# Altium PCB imprimir.PcbDoc (part 1 of 4)
Units mm, origin at the board's own origin, x right, y up, seen from the top; angles counter-clockwise.
Board outline 196.72 x 221.49 mm, 2 copper layers (Top Layer, Bottom Layer); 172 components, 0 nets, 904 pads, 232 vias.
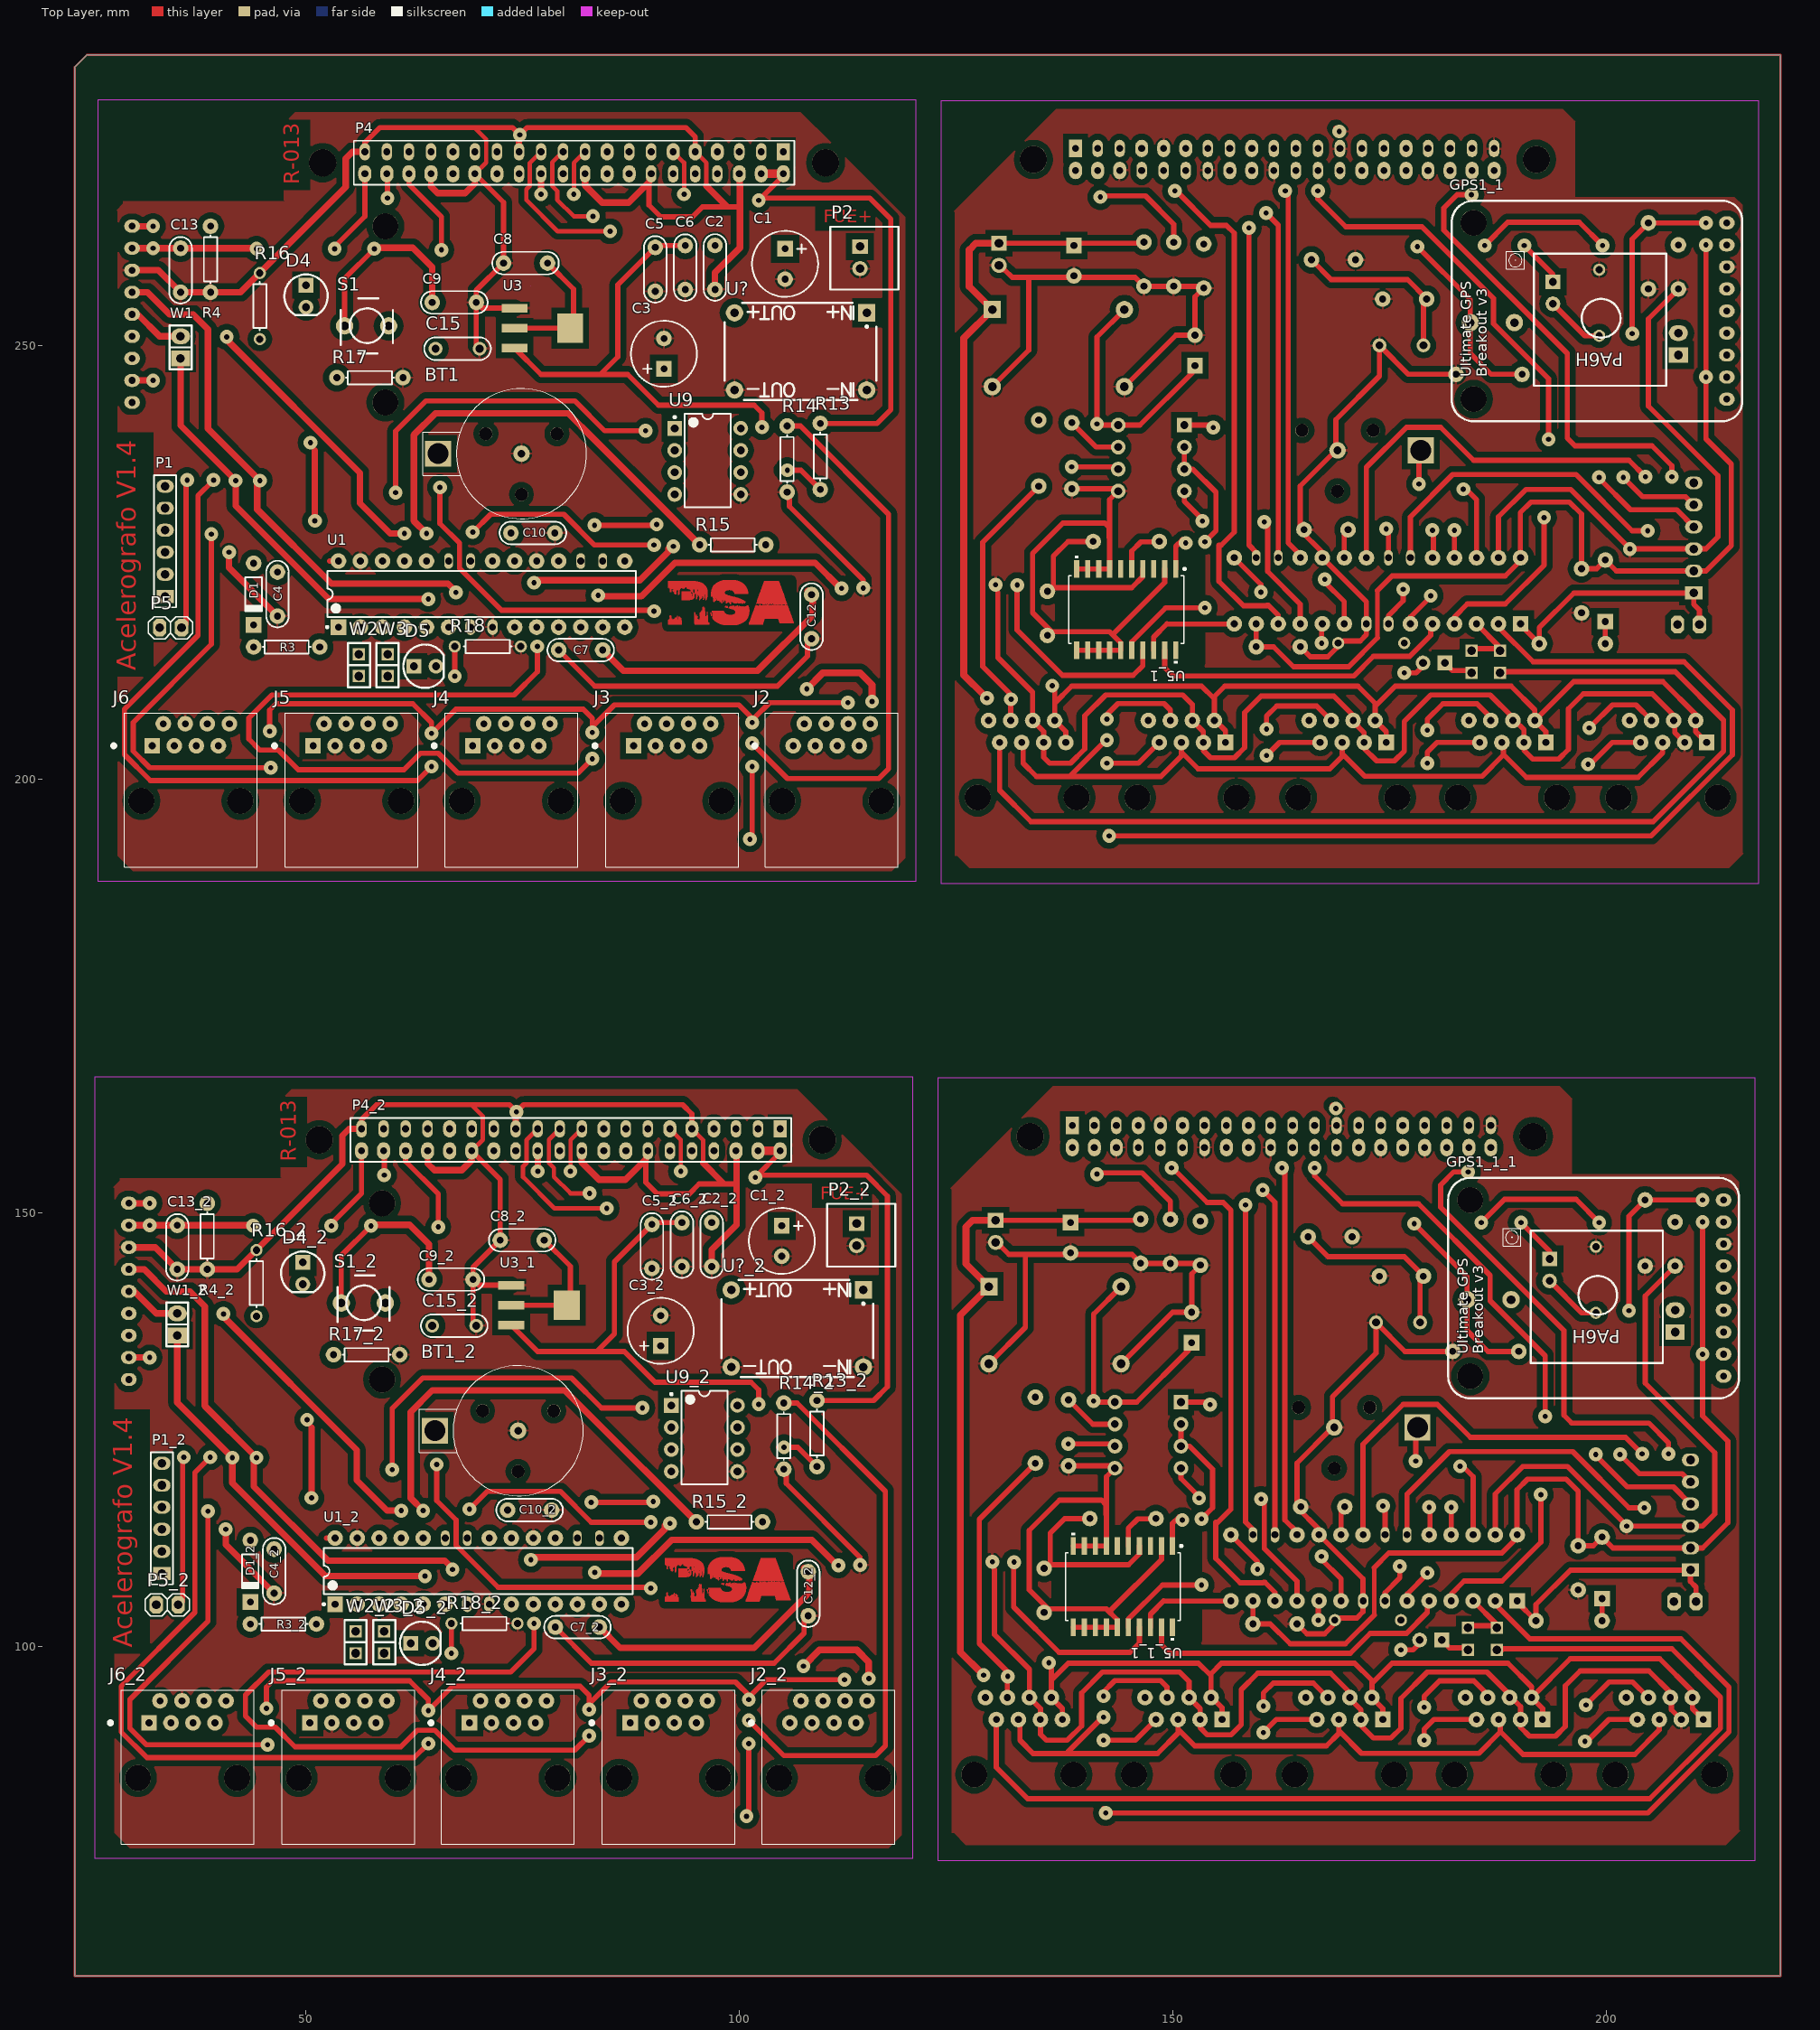
[diagram p0: Top Layer view]
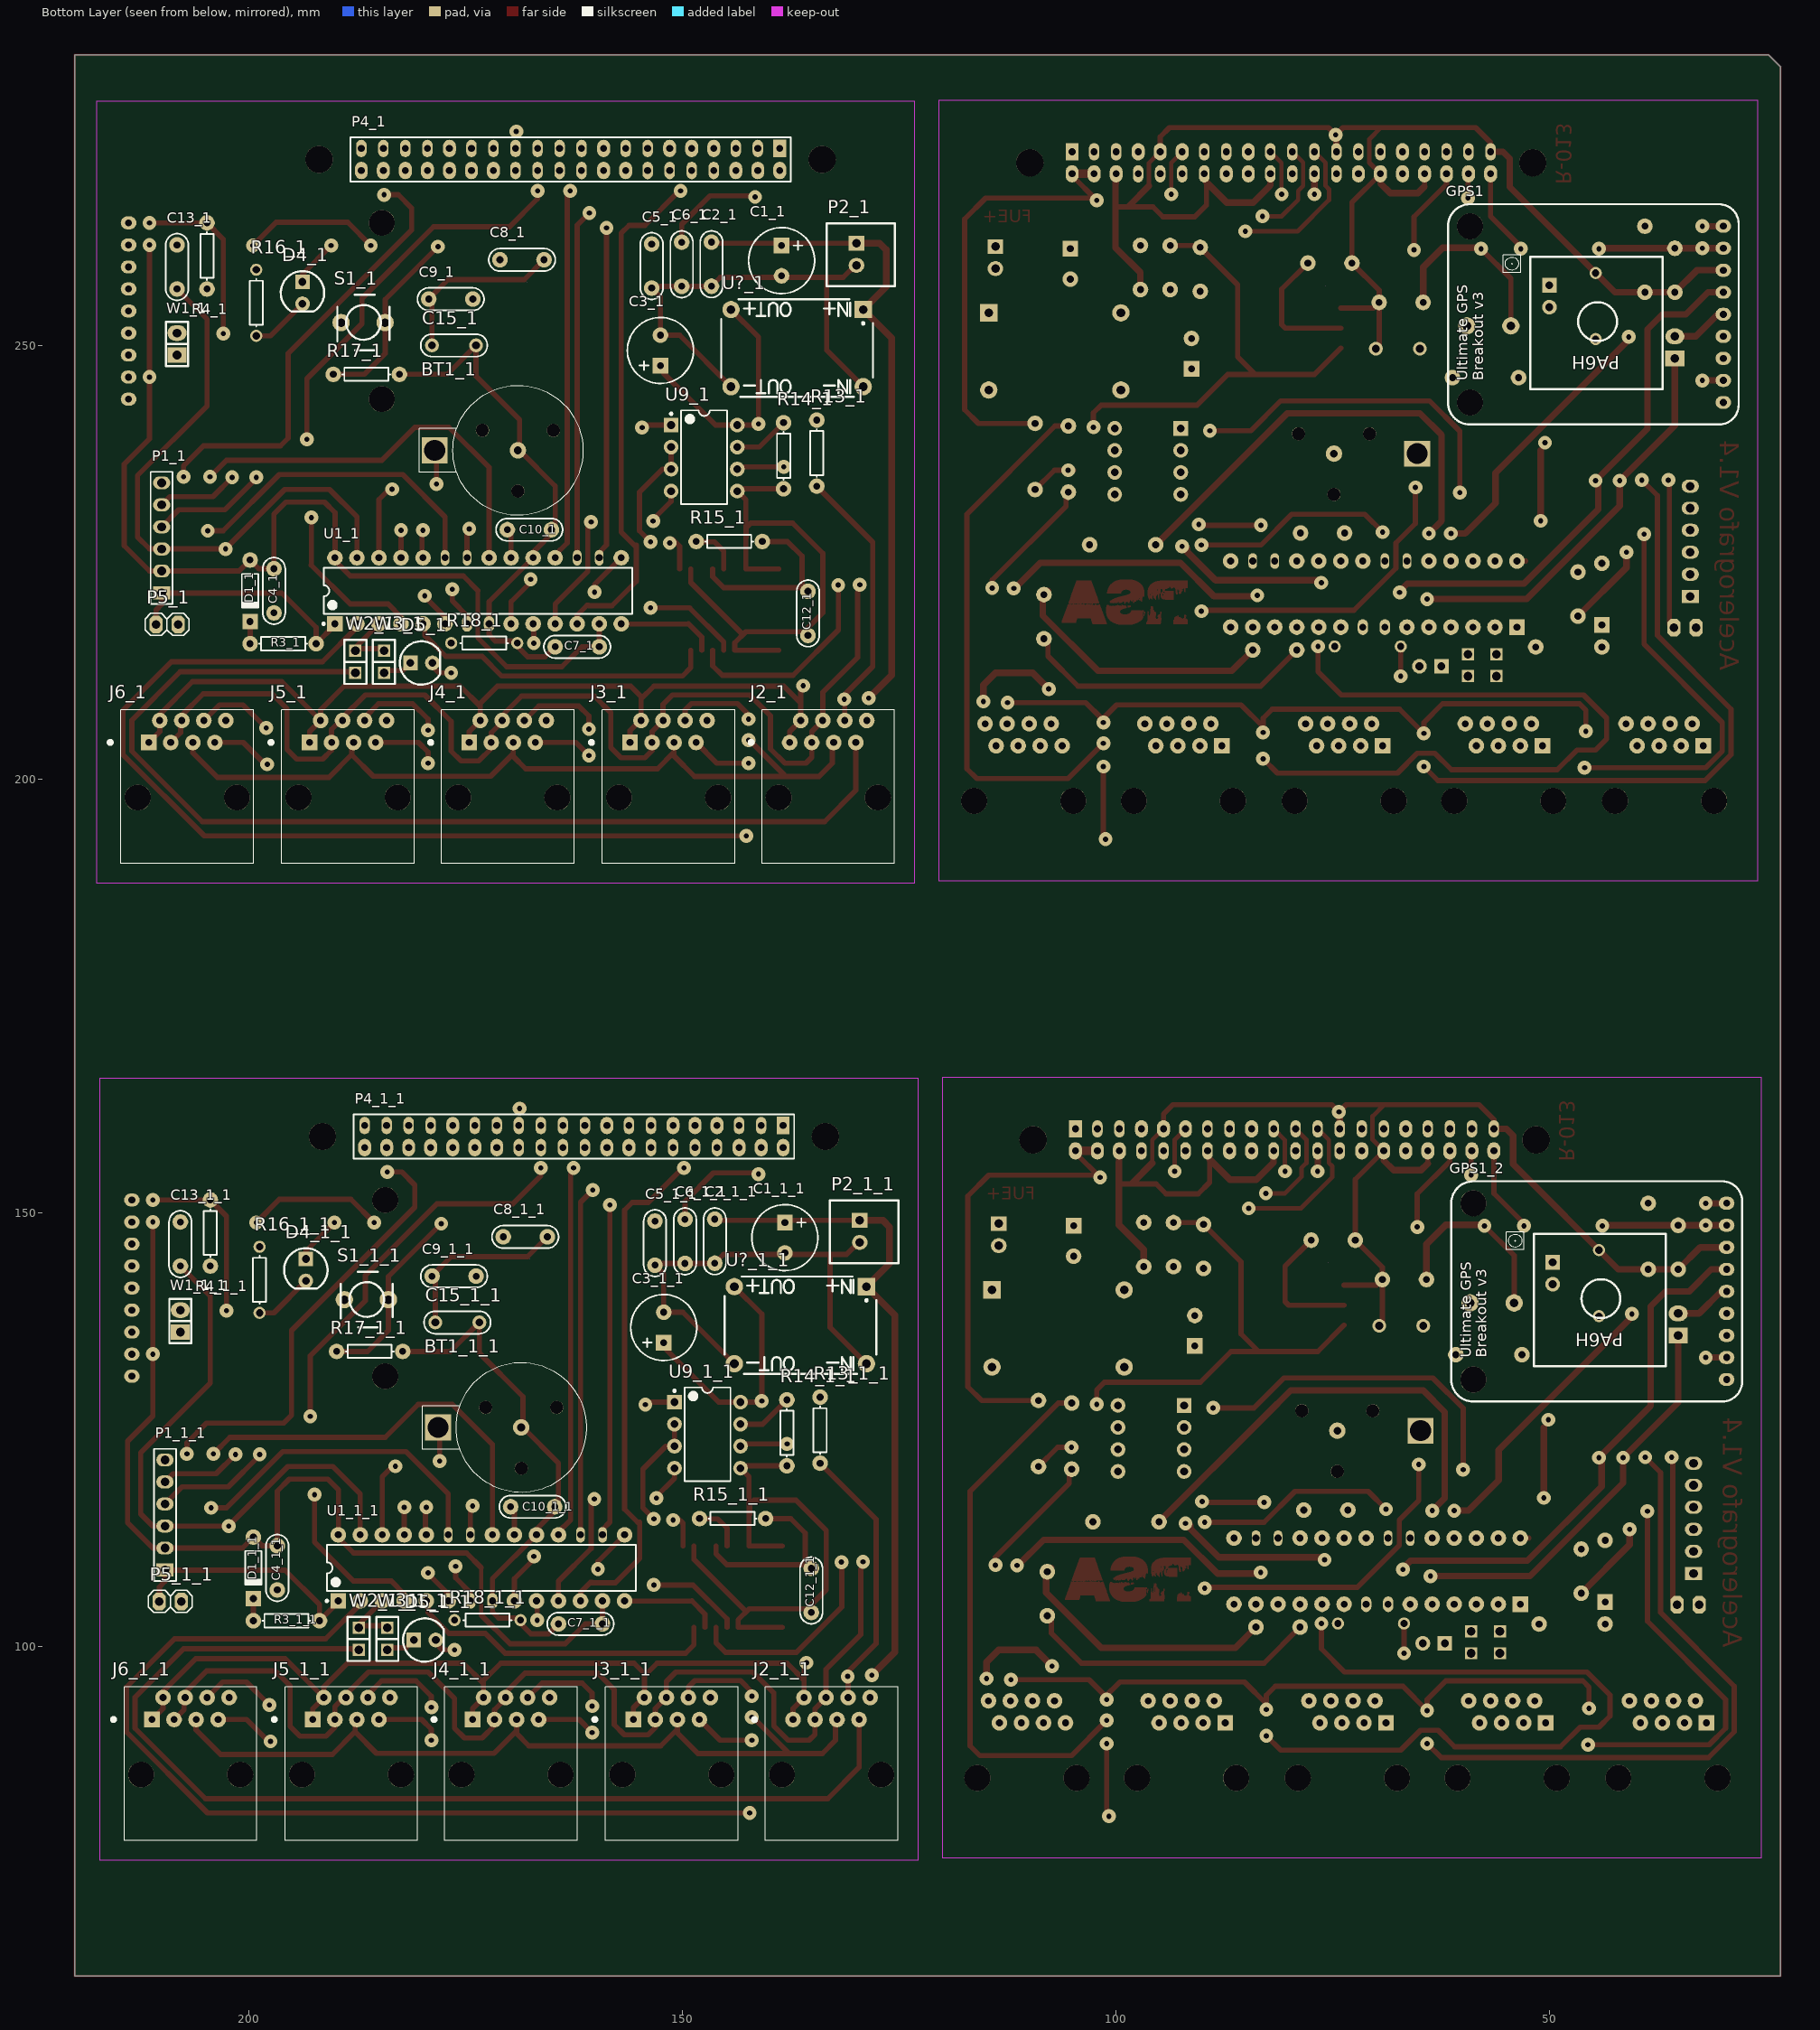
[diagram p1: Bottom Layer view, seen from below]

## Layer stack, top to bottom
Top Solder: solder mask 0.0102, Solder Resist, Dk 3.5
Top Layer: signal copper 0.0356
Dielectric 1: dielectric 0.32, FR-4, Dk 4.8
Bottom Layer: signal copper 0.0356
Bottom Solder: solder mask 0.0102, Solder Resist, Dk 3.5

## Board outline
23.368,61.976 23.368,282.067 24.765,283.464 220.091,283.464 220.091,61.976
cut-out: 75.51,144.231
cut-out: 167.594,144.612
cut-out: 167.975,257.261
cut-out: 75.891,256.88

## Design rules (kind name [scope] priority, off if disabled: settings)
Clearance [All] p1: gap=0.254
PolygonConnect [All] p1: connectstyle=Relief reliefconductorwidth=0.254 reliefentries=4 polygonreliefangle="90 Angle" airgapwidth=0.254
RoutingVias [All] p1: holewidth=0.711 width=1.27 viastyle="Through Hole" minholewidth=0.711 minwidth=1.27 maxholewidth=0.711 maxwidth=1.27
SolderMaskExpansion [All] p1: expansion=0.102
Width [All] p1: maxlimit=0.254 minlimit=0.254 preferedwidth=0.254
30 further rules are at their usual default settings.

## Components (designator, comment, footprint, x,y, rotation, side; value= is the part's Value field where it differs from the comment)
BT1 "Bateria" Bateria-DS1307 65.278,237.49 r0 top
BT1_1 "Bateria" Bateria-DS1307 178.587,237.871 r180 bottom (schematic designator BT1)
BT1_1_1 "Bateria" Bateria-DS1307 178.206,125.222 r180 bottom (schematic designator BT1)
BT1_2 "Bateria" Bateria-DS1307 64.897,124.841 r0 top (schematic designator BT1)
C1 "Cap" C100UFB 105.283,261.112 r270 top
C1_1 "Cap" C100UFB 138.582,261.493 r270 bottom (schematic designator C1)
C1_1_1 "Cap" C100UFB 138.201,148.844 r270 bottom (schematic designator C1)
C1_2 "Cap" C100UFB 104.902,148.463 r270 top (schematic designator C1)
C2 "Cap" RAD0.2#1 97.198,261.497 r270 top
C2_1 "Cap" RAD0.2#1 146.667,261.878 r270 bottom (schematic designator C2)
C2_1_1 "Cap" RAD0.2#1 146.286,149.229 r270 bottom (schematic designator C2)
C2_2 "Cap" RAD0.2#1 96.817,148.848 r270 top (schematic designator C2)
C3 "Cap" C100UFB 91.313,247.269 r90 top
C3_1 "Cap" C100UFB 152.552,247.65 r90 bottom (schematic designator C3)
C3_1_1 "Cap" C100UFB 152.171,135.001 r90 bottom (schematic designator C3)
C3_2 "Cap" C100UFB 90.932,134.62 r90 top (schematic designator C3)
C4 "Cap" RAD0.2#1 46.747,223.838 r270 top
C4_1 "Cap" RAD0.2#1 197.119,224.219 r270 bottom (schematic designator C4)
C4_1_1 "Cap" RAD0.2#1 196.738,111.57 r270 bottom (schematic designator C4)
C4_2 "Cap" RAD0.2#1 46.366,111.189 r270 top (schematic designator C4)
C5 "Cap" RAD0.2#1 90.304,261.278 r270 top
C5_1 "Cap" RAD0.2#1 153.561,261.659 r270 bottom (schematic designator C5)
C5_1_1 "Cap" RAD0.2#1 153.18,149.01 r270 bottom (schematic designator C5)
C5_2 "Cap" RAD0.2#1 89.923,148.629 r270 top (schematic designator C5)
C6 "Cap" RAD0.2#1 93.766,261.485 r270 top
C6_1 "Cap" RAD0.2#1 150.1,261.866 r270 bottom (schematic designator C6)
C6_1_1 "Cap" RAD0.2#1 149.719,149.217 r270 bottom (schematic designator C6)
C6_2 "Cap" RAD0.2#1 93.385,148.836 r270 top (schematic designator C6)
C7 "Cap" RAD0.2#1 84.253,214.846 r180 top
C7_1 "Cap" RAD0.2#1 159.613,215.227 r0 bottom (schematic designator C7)
C7_1_1 "Cap" RAD0.2#1 159.232,102.578 r0 bottom (schematic designator C7)
C7_2 "Cap" RAD0.2#1 83.872,102.197 r180 top (schematic designator C7)
C8 "Cap" RAD0.2#1 77.89,259.46 r180 top
C8_1 "Cap" RAD0.2#1 165.976,259.841 r0 bottom (schematic designator C8)
C8_1_1 "Cap" RAD0.2#1 165.595,147.192 r0 bottom (schematic designator C8)
C8_2 "Cap" RAD0.2#1 77.509,146.811 r180 top (schematic designator C8)
C9 "Cap" RAD0.2#1 64.595,254.927 r0 top
C9_1 "Cap" RAD0.2#1 179.271,255.308 r180 bottom (schematic designator C9)
C9_1_1 "Cap" RAD0.2#1 178.89,142.659 r180 bottom (schematic designator C9)
C9_2 "Cap" RAD0.2#1 64.214,142.278 r0 top (schematic designator C9)
C10 "Cap" RAD0.2#1 73.66,228.346 r0 top
C10_1 "Cap" RAD0.2#1 170.205,228.727 r180 bottom (schematic designator C10)
C10_1_1 "Cap" RAD0.2#1 169.824,116.078 r180 bottom (schematic designator C10)
C10_2 "Cap" RAD0.2#1 73.279,115.697 r0 top (schematic designator C10)
C12 "Cap" RAD0.2#1 108.331,221.234 r270 top
C12_1 "Cap" RAD0.2#1 135.534,221.615 r270 bottom (schematic designator C12)
C12_1_1 "Cap" RAD0.2#1 135.153,108.966 r270 bottom (schematic designator C12)
C12_2 "Cap" RAD0.2#1 107.95,108.585 r270 top (schematic designator C12)
C13 "Cap" RAD0.2#1 35.571,261.176 r270 top
C13_1 "Cap" RAD0.2#1 208.295,261.557 r270 bottom (schematic designator C13)
C13_1_1 "Cap" RAD0.2#1 207.914,148.908 r270 bottom (schematic designator C13)
C13_2 "Cap" RAD0.2#1 35.19,148.527 r270 top (schematic designator C13)
C15 "Cap" RAD0.2#2 64.969,249.593 r0 top
C15_1 "Cap" RAD0.2#2 178.896,249.974 r180 bottom (schematic designator C15)
C15_1_1 "Cap" RAD0.2#2 178.515,137.325 r180 bottom (schematic designator C15)
C15_2 "Cap" RAD0.2#2 64.588,136.944 r0 top (schematic designator C15)
D1 "1N914" DO-35 43.994,221.298 r270 top
D1_1 "1N914" DO-35 199.872,221.679 r270 bottom (schematic designator D1)
D1_1_1 "1N914" DO-35 199.491,109.03 r270 bottom (schematic designator D1)
D1_2 "1N914" DO-35 43.613,108.649 r270 top (schematic designator D1)
D4 "LED3" LED2 50.038,255.651 r270 top
D4_1 "LED3" LED2 193.827,256.032 r270 bottom (schematic designator D4)
D4_1_1 "LED3" LED2 193.446,143.383 r270 bottom (schematic designator D4)
D4_2 "LED3" LED2 49.657,143.002 r270 top (schematic designator D4)
D5 "LED3" LED2 63.754,212.979 r0 top (schematic designator D4)
D5_1 "LED3" LED2 180.111,213.36 r180 bottom (schematic designator D4)
D5_1_1 "LED3" LED2 179.73,100.711 r180 bottom (schematic designator D4)
D5_2 "LED3" LED2 63.373,100.33 r0 top (schematic designator D4)
GPS1 "GPS_BREAKOUT_V3" GPS_BREAKOUT_V3 29.983,263.716 r0 bottom
GPS1_1 "GPS_BREAKOUT_V3" GPS_BREAKOUT_V3 213.883,264.097 r180 top (schematic designator GPS1)
GPS1_1_1 "GPS_BREAKOUT_V3" GPS_BREAKOUT_V3 213.502,151.448 r180 top (schematic designator GPS1)
GPS1_2 "GPS_BREAKOUT_V3" GPS_BREAKOUT_V3 29.602,151.067 r0 bottom (schematic designator GPS1)
J2 "54602-908LF" *AMPHENOL_54602-908LF#1 110.665,197.461 r0 top
J2_1 "54602-908LF" *AMPHENOL_54602-908LF#1 133.2,197.842 r180 bottom (schematic designator J2)
J2_1_1 "54602-908LF" *AMPHENOL_54602-908LF#1 132.819,85.193 r180 bottom (schematic designator J2)
J2_2 "54602-908LF" *AMPHENOL_54602-908LF#1 110.284,84.812 r0 top (schematic designator J2)
J3 "54602-908LF" *AMPHENOL_54602-908LF#2 92.25,197.461 r0 top
J3_1 "54602-908LF" *AMPHENOL_54602-908LF#2 151.615,197.842 r180 bottom (schematic designator J3)
J3_1_1 "54602-908LF" *AMPHENOL_54602-908LF#2 151.234,85.193 r180 bottom (schematic designator J3)
J3_2 "54602-908LF" *AMPHENOL_54602-908LF#2 91.869,84.812 r0 top (schematic designator J3)
J4 "54602-908LF" *AMPHENOL_54602-908LF#2 73.708,197.461 r0 top
J4_1 "54602-908LF" *AMPHENOL_54602-908LF#2 170.157,197.842 r180 bottom (schematic designator J4)
J4_1_1 "54602-908LF" *AMPHENOL_54602-908LF#2 169.776,85.193 r180 bottom (schematic designator J4)
J4_2 "54602-908LF" *AMPHENOL_54602-908LF#2 73.327,84.812 r0 top (schematic designator J4)
J5 "54602-908LF" *AMPHENOL_54602-908LF#2 55.293,197.461 r0 top
J5_1 "54602-908LF" *AMPHENOL_54602-908LF#2 188.572,197.842 r180 bottom (schematic designator J5)
J5_1_1 "54602-908LF" *AMPHENOL_54602-908LF#2 188.191,85.193 r180 bottom (schematic designator J5)
J5_2 "54602-908LF" *AMPHENOL_54602-908LF#2 54.912,84.812 r0 top (schematic designator J5)
J6 "54602-908LF" *AMPHENOL_54602-908LF#2 36.751,197.461 r0 top
J6_1 "54602-908LF" *AMPHENOL_54602-908LF#2 207.114,197.842 r180 bottom (schematic designator J6)
J6_1_1 "54602-908LF" *AMPHENOL_54602-908LF#2 206.733,85.193 r180 bottom (schematic designator J6)
J6_2 "54602-908LF" *AMPHENOL_54602-908LF#2 36.37,84.812 r0 top (schematic designator J6)
P1 "Grabador" HDR1X6 33.793,221.044 r90 top
P1_1 "Grabador" HDR1X6 210.073,221.425 r90 bottom (schematic designator P1)
P1_1_1 "Grabador" HDR1X6 209.692,108.776 r90 bottom (schematic designator P1)
P1_2 "Grabador" HDR1X6 33.412,108.395 r90 top (schematic designator P1)
P2 "Entrada fuente externa" MOLEX-2 113.919,261.366 r270 top
P2_1 "Entrada fuente externa" MOLEX-2 129.946,261.747 r270 bottom (schematic designator P2)
P2_1_1 "Entrada fuente externa" MOLEX-2 129.565,149.098 r270 bottom (schematic designator P2)
P2_2 "Entrada fuente externa" MOLEX-2 113.538,148.717 r270 top (schematic designator P2)
P4 "RPI_Pins" HDR2X20 105.081,272.298 r180 top
P4_1 "RPI_Pins" HDR2X20 138.785,272.679 r0 bottom (schematic designator P4)
P4_1_1 "RPI_Pins" HDR2X20 138.404,160.03 r0 bottom (schematic designator P4)
P4_2 "RPI_Pins" HDR2X20 104.7,159.649 r180 top (schematic designator P4)
P5 "Header 2" "Header 1X2" 33.147,217.424 r0 top
P5_1 "Header 2" "Header 1X2" 210.718,217.805 r180 bottom (schematic designator P5)
P5_1_1 "Header 2" "Header 1X2" 210.337,105.156 r180 bottom (schematic designator P5)
P5_2 "Header 2" "Header 1X2" 32.766,104.775 r0 top (schematic designator P5)
R3 "Res1" AXIAL-0.3#1 47.804,215.202 r180 top
R3_1 "Res1" AXIAL-0.3#1 196.062,215.583 r0 bottom (schematic designator R3)
R3_1_1 "Res1" AXIAL-0.3#1 195.681,102.934 r0 bottom (schematic designator R3)
R3_2 "Res1" AXIAL-0.3#1 47.423,102.553 r180 top (schematic designator R3)
R4 "Res1" AXIAL-0.3#1 39.025,259.906 r270 top
R4_1 "Res1" AXIAL-0.3#1 204.84,260.287 r270 bottom (schematic designator R4)
R4_1_1 "Res1" AXIAL-0.3#1 204.459,147.638 r270 bottom (schematic designator R4)
R4_2 "Res1" AXIAL-0.3#1 38.644,147.257 r270 top (schematic designator R4)
R13 "Res1" AXIAL-0.3#1 109.34,237.169 r90 top
R13_1 "Res1" AXIAL-0.3#1 134.525,237.55 r90 bottom (schematic designator R13)
R13_1_1 "Res1" AXIAL-0.3#1 134.144,124.901 r90 bottom (schematic designator R13)
R13_2 "Res1" AXIAL-0.3#1 108.959,124.52 r90 top (schematic designator R13)
R14 "Res1" AXIAL-0.3#1 105.515,236.867 r270 top
R14_1 "Res1" AXIAL-0.3#1 138.35,237.248 r270 bottom (schematic designator R14)
R14_1_1 "Res1" AXIAL-0.3#1 137.969,124.599 r270 bottom (schematic designator R14)
R14_2 "Res1" AXIAL-0.3#1 105.134,124.218 r270 top (schematic designator R14)
R15 "Res1" AXIAL-0.3#1 99.249,226.983 r0 top
R15_1 "Res1" AXIAL-0.3#1 144.617,227.364 r180 bottom (schematic designator R15)
R15_1_1 "Res1" AXIAL-0.3#1 144.236,114.715 r180 bottom (schematic designator R15)
R15_2 "Res1" AXIAL-0.3#1 98.868,114.334 r0 top (schematic designator R15)
R16 "Res1" AXIAL-0.3#2 44.704,254.508 r90 top
R16_1 "Res1" AXIAL-0.3#2 199.161,254.889 r90 bottom (schematic designator R16)
R16_1_1 "Res1" AXIAL-0.3#2 198.78,142.24 r90 bottom (schematic designator R16)
R16_2 "Res1" AXIAL-0.3#2 44.323,141.859 r90 top (schematic designator R16)
R17 "Res1" AXIAL-0.3#1 57.404,246.253 r0 top
R17_1 "Res1" AXIAL-0.3#1 186.461,246.634 r180 bottom (schematic designator R17)
R17_1_1 "Res1" AXIAL-0.3#1 186.08,133.985 r180 bottom (schematic designator R17)
R17_2 "Res1" AXIAL-0.3#1 57.023,133.604 r0 top (schematic designator R17)
R18 "Res1" AXIAL-0.3#3 70.993,215.265 r0 top (schematic designator R17)
R18_1 "Res1" AXIAL-0.3#3 172.872,215.646 r180 bottom (schematic designator R17)
R18_1_1 "Res1" AXIAL-0.3#3 172.491,102.997 r180 bottom (schematic designator R17)
R18_2 "Res1" AXIAL-0.3#3 70.612,102.616 r0 top (schematic designator R17)
S1 "SW-PB" PULSA4 57.023,252.222 r0 top
S1_1 "SW-PB" PULSA4 186.842,252.603 r180 bottom (schematic designator S1)
S1_1_1 "SW-PB" PULSA4 186.461,139.954 r180 bottom (schematic designator S1)
S1_2 "SW-PB" PULSA4 56.642,139.573 r0 top (schematic designator S1)
U1 "DSPIC33EP256MC202-I/SP" MCHP-SPDIP-SP28 70.283,221.298 r90 top
U1_1 "DSPIC33EP256MC202-I/SP" MCHP-SPDIP-SP28 173.583,221.679 r90 bottom (schematic designator U1)
U1_1_1 "DSPIC33EP256MC202-I/SP" MCHP-SPDIP-SP28 173.202,109.03 r90 bottom (schematic designator U1)
U1_2 "DSPIC33EP256MC202-I/SP" MCHP-SPDIP-SP28 69.902,108.649 r90 top (schematic designator U1)
U3 "LD33V" SOT-223 74.093,254.267 r270 top
U3_1 "LD33V" SOT-223 73.712,141.618 r270 top (schematic designator U3)
U5_1 "DS3234S#" 21-0042B_20 144.617,219.507 r270 top (schematic designator U5)
U5_1_1 "DS3234S#" 21-0042B_20 144.236,106.858 r270 top (schematic designator U5)
U9 "MAX485" MAX485 92.546,240.409 r270 top
U9_1 "MAX485" MAX485 151.319,240.79 r270 bottom (schematic designator U9)
U9_1_1 "MAX485" MAX485 150.938,128.141 r270 bottom (schematic designator U9)
U9_2 "MAX485" MAX485 92.165,127.76 r270 top (schematic designator U9)
U? "STEP_DOWN_CONVERTER" STEP_DOWN_CONVERTER 115.824,254.889 r180 top
U?_1 "STEP_DOWN_CONVERTER" STEP_DOWN_CONVERTER 128.041,255.27 r0 bottom (schematic designator U?)
U?_1_1 "STEP_DOWN_CONVERTER" STEP_DOWN_CONVERTER 127.66,142.621 r0 bottom (schematic designator U?)
U?_2 "STEP_DOWN_CONVERTER" STEP_DOWN_CONVERTER 115.443,142.24 r180 top (schematic designator U?)
W1 "Jumper" SIP-2#1 35.571,248.476 r90 top
W1_1 "Jumper" SIP-2#1 208.295,248.857 r90 bottom (schematic designator W1)
W1_1_1 "Jumper" SIP-2#1 207.914,136.208 r90 bottom (schematic designator W1)
W1_2 "Jumper" SIP-2#1 35.19,135.827 r90 top (schematic designator W1)
W2 "Jumper" SIP-2#2 56.134,214.376 r270 top
W2_1 "Jumper" SIP-2#2 187.731,214.757 r270 bottom (schematic designator W2)
W2_1_1 "Jumper" SIP-2#2 187.35,102.108 r270 bottom (schematic designator W2)
W2_2 "Jumper" SIP-2#2 55.753,101.727 r270 top (schematic designator W2)
W3 "Jumper" SIP-2#2 59.436,214.376 r270 top
W3_1 "Jumper" SIP-2#2 184.429,214.757 r270 bottom (schematic designator W3)
W3_1_1 "Jumper" SIP-2#2 184.048,102.108 r270 bottom (schematic designator W3)
W3_2 "Jumper" SIP-2#2 59.055,101.727 r270 top (schematic designator W3)

## Footprints (in the part's own frame and the unit in brackets; to place one, negate y for a bottom-side part, rotate by r counter-clockwise, add the part's x,y. Pads: shape width x height; smd on the part's side, far side on the other; paste and mask are expansions set on the pad)
21-0042B_20 [mm]
  rect 2x0.6 smd paste+0 mask+0: 1(-4.686,5.715) 2(-4.686,4.445) 3(-4.686,3.175) 4(-4.686,1.905) 5(-4.686,0.635) 6(-4.686,-0.635) 7(-4.686,-1.905) 8(-4.686,-3.175) 9(-4.686,-4.445) 10(-4.686,-5.715) 11(4.686,-5.715) 12(4.686,-4.445) 13(4.686,-3.175) 14(4.686,-1.905) 15(4.686,-0.635) 16(4.686,0.635) 17(4.686,1.905) 18(4.686,3.175) 19(4.686,4.445) 20(4.686,5.715)
  silkscreen extent -6.18,-6.63 6.18,6.86, body extent -5.32,-6.5 5.32,6.5, height 2.64
*AMPHENOL_54602-908LF#1 [mm]
  round 1.8 hole 0.8: 1(-4.445,6.35) 2(-3.175,8.89) 3(-1.905,6.35) 4(-0.635,8.89) 5(0.635,6.35) 6(1.905,8.89) 7(3.175,6.35) 8(4.445,8.89)
  round 3 hole 3 unplated: None(-5.715,0) None(5.715,0)
  silkscreen extent -9.09,-7.62 7.65,10.12
*AMPHENOL_54602-908LF#2 [mm]
  rect 1.8x1.8 hole 0.8: 1(-4.445,6.35)
  round 1.8 hole 0.8: 2(-3.175,8.89) 3(-1.905,6.35) 4(-0.635,8.89) 5(0.635,6.35) 6(1.905,8.89) 7(3.175,6.35) 8(4.445,8.89)
  round 3 hole 3 unplated: None(-5.715,0) None(5.715,0)
  silkscreen extent -9.09,-7.62 7.65,10.12
AXIAL-0.3#1 [mm] "Axial Device, Thru-Hole; 2 Leads; 0.3 in Pin Spacing"
  round 1.8 hole 0.8: 1(-3.81,0) 2(3.81,0)
  silkscreen extent -2.77,-0.76 2.77,0.76
AXIAL-0.3#2 [mm] "Axial Device, Thru-Hole; 2 Leads; 0.3 in Pin Spacing"
  round 1.4 hole 0.85: 1(-3.81,0) 2(3.81,0)
  silkscreen extent -2.77,-0.76 2.77,0.76
AXIAL-0.3#3 [mm] "Axial Device, Thru-Hole; 2 Leads; 0.3 in Pin Spacing"
  round 1.4 hole 0.8: 1(-3.81,0) 2(3.81,0)
  silkscreen extent -2.77,-0.76 2.77,0.76
Bateria-DS1307 [mm]
  rect 3x3 hole 2.4: 0(0,0)
  round 1.9 hole 0.9: 1(9.6,0)
  round 1.524 hole 1.5: 2(5.5,2.3) 3(13.7,2.3) 4(9.6,-4.7)
  silkscreen extent -1.78,-7.5 17.1,7.5, body extent -1.8,-7.43 17.24,7.63, height 4.31
C100UFB [mm]
  rect 1.8x1.8 hole 0.8: 1(0,0)
  round 1.8 hole 0.8: 2(3.5,0)
  silkscreen extent -2.07,-3.81 5.55,3.81
DO-35 [mm] "Diode, Axial; Body 3.8 x 1.9 mm (LxDia. max), Lead Dia. 0.53 mm (max)"
  round 1.8 hole 0.8: 1(-3.55,0)
  rect 1.8x1.8 hole 0.8: 2(3.55,0)
  silkscreen extent -1.95,-0.95 2.05,0.95
GPS_BREAKOUT_V3 [mm]
  oval 1.8x1.5 hole 0.8: 0(0,0) 1(0,2.54) 2(0,5.08) 3(0,7.62) 4(0,10.16) 5(0,12.7) 6(0,15.24) 7(0,17.78) 8(0,20.32)
  round 3 hole 3: ""(29.21,0) ""(29.21,20.32)
  silkscreen extent -1.78,-2.54 31.75,22.86
HDR1X6 [mm] "Connector; Header; 6 Position"
  rect 1.5x2 hole 1: 1(0,0)
  oval 1.5x2 hole 1: 2(2.54,0) 3(5.08,0) 4(7.62,0) 5(10.16,0) 6(12.7,0)
  silkscreen extent -1.27,-1.27 13.97,1.27
HDR2X20 [mm] "Connector; Header; 20x2 Position"
  rect 1.5x2 hole 0.8: 1(0,0)
  oval 1.5x2 hole 0.8: 2(0,2.54) 4(2.54,2.54) 6(5.08,2.54) 7(7.62,0) 9(10.16,0) 11(12.7,0) 16(17.78,2.54) 17(20.32,0) 18(20.32,2.54) 28(33.02,2.54) 30(35.56,2.54) 31(38.1,0) 32(38.1,2.54) 34(40.64,2.54) 36(43.18,2.54) 38(45.72,2.54) 40(48.26,2.54)
  oval 1.2x2 hole 0.8: 3(2.54,0) 5(5.08,0) 8(7.62,2.54) 10(10.16,2.54) 12(12.7,2.54) 13(15.24,0) 14(15.24,2.54) 15(17.78,0) 19(22.86,0) 20(22.86,2.54) 21(25.4,0) 22(25.4,2.54) 23(27.94,0) 24(27.94,2.54) 25(30.48,0) 26(30.48,2.54) 27(33.02,0) 29(35.56,0) 33(40.64,0) 35(43.18,0) 37(45.72,0) 39(48.26,0)
  silkscreen extent -1.27,-1.27 49.53,3.81
"Header 1X2" [mil] "Conector Header 1 linea 2 terminales"
  oct 60x80 hole 39.37: 1(0,0) 2(100,0)
  silkscreen extent -50,-50 150,50, body extent -50,-49 150,49, height 341
LED2 [mm]
  rect 1.7x1.7 hole 0.9: 1(-1.27,0)
  round 1.7 hole 0.9: 2(1.27,0)
  silkscreen extent -2.5,-2.5 2.17,2.5
MAX485 [mm]
  rect 1.7x1.7 hole 0.9: 1(0,0)
  round 1.7 hole 0.9: 2(2.54,0) 3(5.08,0) 4(7.62,0) 5(7.62,7.62) 6(5.08,7.62) 7(2.54,7.62) 8(0,7.62)
  silkscreen extent -1.69,-0.12 9.1,6.46, body extent -1.64,0.2 9,7.41, height 5.34
MCHP-SPDIP-SP28 [mm] "DIP, 28-Leads, Body 34.86x6.79mm, Pitch 2.54mm"
  rect 1.8x1.8 hole 0.8: 1(-3.81,16.51)
  round 1.8 hole 0.8: 2(-3.81,13.97) 3(-3.81,11.43) 4(-3.81,8.89) 5(-3.81,6.35) 6(-3.81,3.81) 9(-3.81,-3.81) 10(-3.81,-6.35) 11(-3.81,-8.89) 12(-3.81,-11.43) 13(-3.81,-13.97) 14(-3.81,-16.51) 15(3.81,-16.51) 18(3.81,-8.89) 19(3.81,-6.35) 20(3.81,-3.81) 21(3.81,-1.27) 24(3.81,6.35) 25(3.81,8.89) 26(3.81,11.43) 27(3.81,13.97) 28(3.81,16.51)
  oval 1.8x1.2 hole 0.8: 7(-3.81,1.27) 8(-3.81,-1.27)
  oval 1.8x1 hole 0.8: 16(3.81,-13.97) 17(3.81,-11.43) 22(3.81,1.27) 23(3.81,3.81)
  silkscreen extent -3.93,-17.8 2.65,17.93, body extent -3.95,-17.77 3.95,17.77, height 5.08
MOLEX-2 [mm]
  rect 1.7x1.8 hole 1: 1(0,0)
  oval 1.7x1.8 hole 1: 2(2.54,0)
  silkscreen extent -2.29,-3.43 4.95,4.45, body extent -2.31,-3.5 4.9,4.4, height 10.4
PULSA4 [mm]
  round 2 hole 1: 1(-2.54,0) 2(2.54,0)
  silkscreen extent -2.97,-3.18 3.03,3.19
RAD0.2#1 [mm]
  round 1.8 hole 0.8: 1(0,0) 2(5.08,0)
  silkscreen extent -1.3,-1.3 6.38,1.3
RAD0.2#2 [mm]
  round 1.6 hole 0.9: 1(0,0) 2(5.08,0)
  silkscreen extent -1.3,-1.3 6.38,1.3
SIP-2#1 [mm]
  rect 1.8x2.2 hole 1: 1(0,0)
  oval 1.8x2.2 hole 1: 2(2.54,0)
  silkscreen extent -1.27,-1.27 3.81,1.27
SIP-2#2 [mm]
  rect 1.4x1.4 hole 1: 1(0,0) 2(2.54,0)
  silkscreen extent -1.27,-1.27 3.81,1.27
SOT-223 [mm]
  rect 1x3 smd: 1(4.6,0) 2(0,0) 3(2.3,0)
  rect 3.4x3 smd: 3(2.3,6.4)
  body extent -1.2,1.41 5.8,5, height 1.1
STEP_DOWN_CONVERTER [mm]
  rect 2x2 hole 1: 1(1.13,1.165)
  round 2 hole 1: 2(1.13,10.055) 3(16.37,1.165) 4(16.37,10.055)
  silkscreen extent 0,0 17.5,11.22, body extent -0.14,-0.1 17.64,11.33, height 6.63

## Part data
BT1 BT1_1 BT1_1_1 BT1_2: library part BateriaDS1307
C1 C1_1 C1_1_1 C1_2 C2 C2_1 C2_1_1 C2_2 C3 C3_1 C3_1_1 C3_2 C4 C4_1 C4_1_1 C4_2 C5 C5_1 C5_1_1 C5_2 C6 C6_1 C6_1_1 C6_2 C7 C7_1 C7_1_1 C7_2 C8 C8_1 C8_1_1 C8_2 C9 C9_1 C9_1_1 C9_2 C10 C10_1 C10_1_1 C10_2 C12 C12_1 C12_1_1 C12_2 C13 C13_1 C13_1_1 C13_2 C15 C15_1 C15_1_1 C15_2: "Capacitor"
D1 D1_1 D1_1_1 D1_2: library part "Diode 1N914", "High Conductance Fast Diode"
D4 D4_1 D4_1_1 D4_2 D5 D5_1 D5_1_1 D5_2: "Typical BLUE SiC LED"
J2 J2_1 J2_1_1 J2_2 J3 J3_1 J3_1_1 J3_2 J4 J4_1 J4_1_1 J4_2 J5 J5_1 J5_1_1 J5_2 J6 J6_1 J6_1_1 J6_2: "Jack Modular Connector 8p8c _RJ45, Ethernet_ 90° Angle _Right_ Unshielded Cat3"
P1 P1_1 P1_1_1 P1_2: library part "Header 6", "Header, 6-Pin"
P2 P2_1 P2_1_1 P2_2: library part "Header 2", "Header, 2-Pin"
P4 P4_1 P4_1_1 P4_2: library part "Header 20X2", "Header, 20-Pin, Dual row"
P5 P5_1 P5_1_1 P5_2: "Header, 2-Pin"
R3 R3_1 R3_1_1 R3_2 R4 R4_1 R4_1_1 R4_2 R13 R13_1 R13_1_1 R13_2 R14 R14_1 R14_1_1 R14_2 R15 R15_1 R15_1_1 R15_2 R16 R16_1 R16_1_1 R16_2 R17 R17_1 R17_1_1 R17_2 R18 R18_1 R18_1_1 R18_2: "Resistor"
S1 S1_1 S1_1_1 S1_2: "Switch"
U1 U1_1 U1_1_1 U1_2: "16-Bit Microcontroller and Digital Signal Controller with High-Speed PWM, Op Amps and Advanced Analog, 70 MIPS, 21 I/O, GPIO, -40 to 85 degC, 28-pin SPDIP (SP28), Tube"
U3 U3_1: "High-Performance 16-bit Digital Signal Controller, 24 KB Flash, 2 KB SRAM, 1 KB EEPROM, 40-Pin PDIP, Industrial Temperature"
U5_1 U5_1_1: "No Description Available"
W1 W1_1 W1_1_1 W1_2 W2 W2_1 W2_1_1 W2_2 W3 W3_1 W3_1_1 W3_2: "Jumper Wire"

## Free pads (board coordinates)
  round 3.15 hole 3.15: ""(51.57,158.379) ""(51.951,271.028) ""(109.57,158.379) ""(109.951,271.028) ""(133.534,158.76) ""(133.915,271.409) ""(191.534,158.76) ""(191.915,271.409)

## Via types
v1: diameter 1.6, hole 0.6, Top Layer to Bottom Layer, 232 vias

## Nets (pads, with @x,y where several pads share a name; then routed paths per layer and width w, separated by ;. In a path a pad name is that pad's centre, name@x,y a point inside that pad or via, vN(x,y) a via of type N, cw(c..) or ccw(c..) an arc to the next point about the centre after c; other vN are vias at no path point)
pads on no net: BT1.0 BT1.1 BT1.2 BT1.3 BT1.4 BT1_1.0 BT1_1.1 BT1_1.2 BT1_1.3 BT1_1.4 BT1_1_1.0 BT1_1_1.1 BT1_1_1.2 BT1_1_1.3 BT1_1_1.4 BT1_2.0 BT1_2.1 BT1_2.2 BT1_2.3 BT1_2.4 C1.1 C1.2 C1_1.1 C1_1.2 C1_1_1.1 C1_1_1.2 C1_2.1 C1_2.2 C2.1 C2.2 C2_1.1 C2_1.2 C2_1_1.1 C2_1_1.2 C2_2.1 C2_2.2 C3.1 C3.2 C3_1.1 C3_1.2 C3_1_1.1 C3_1_1.2 C3_2.1 C3_2.2 C4.1 C4.2 C4_1.1 C4_1.2 C4_1_1.1 C4_1_1.2 C4_2.1 C4_2.2 C5.1 C5.2 C5_1.1 C5_1.2 C5_1_1.1 C5_1_1.2 C5_2.1 C5_2.2 C6.1 C6.2 C6_1.1 C6_1.2 C6_1_1.1 C6_1_1.2 C6_2.1 C6_2.2 C7.1 C7.2 C7_1.1 C7_1.2 C7_1_1.1 C7_1_1.2 C7_2.1 C7_2.2 C8.1 C8.2 C8_1.1 C8_1.2 C8_1_1.1 C8_1_1.2 C8_2.1 C8_2.2 C9.1 C9.2 C9_1.1 C9_1.2 C9_1_1.1 C9_1_1.2 C9_2.1 C9_2.2 C10.1 C10.2 C10_1.1 C10_1.2 C10_1_1.1 C10_1_1.2 C10_2.1 C10_2.2 C12.1 C12.2 C12_1.1 C12_1.2 C12_1_1.1 C12_1_1.2 C12_2.1 C12_2.2 C13.1 C13.2 C13_1.1 C13_1.2 C13_1_1.1 C13_1_1.2 C13_2.1 C13_2.2 C15.1 C15.2 C15_1.1 C15_1.2 C15_1_1.1 C15_1_1.2 C15_2.1 C15_2.2 D1.1 D1.2 D1_1.1 D1_1.2 D1_1_1.1 D1_1_1.2 D1_2.1 D1_2.2 D4.1 D4.2 D4_1.1 D4_1.2 D4_1_1.1 D4_1_1.2 D4_2.1 D4_2.2 D5.1 D5.2 D5_1.1 D5_1.2 D5_1_1.1 D5_1_1.2 D5_2.1 D5_2.2 GPS1. GPS1.0 GPS1.1 GPS1.2 GPS1.3 GPS1.4 GPS1.5 GPS1.6 GPS1.7 GPS1.8 GPS1_1. GPS1_1.0 GPS1_1.1 GPS1_1.2 GPS1_1.3 GPS1_1.4 GPS1_1.5 GPS1_1.6 GPS1_1.7 GPS1_1.8 GPS1_1_1. GPS1_1_1.0 GPS1_1_1.1 GPS1_1_1.2 GPS1_1_1.3 GPS1_1_1.4 GPS1_1_1.5 GPS1_1_1.6 GPS1_1_1.7 GPS1_1_1.8 GPS1_2. GPS1_2.0 GPS1_2.1 GPS1_2.2 GPS1_2.3 GPS1_2.4 GPS1_2.5 GPS1_2.6 GPS1_2.7 GPS1_2.8 J2.1 J2.2 J2.3 J2.4 J2.5 J2.6 J2.7 J2.8 J2.None J2_1.1 J2_1.2 J2_1.3 J2_1.4 J2_1.5 J2_1.6 J2_1.7 J2_1.8 J2_1.None J2_1_1.1 J2_1_1.2 J2_1_1.3 J2_1_1.4 J2_1_1.5 J2_1_1.6 J2_1_1.7 J2_1_1.8 J2_1_1.None J2_2.1 J2_2.2 J2_2.3 J2_2.4 J2_2.5 J2_2.6 J2_2.7 J2_2.8 J2_2.None J3.1 J3.2 J3.3 J3.4 J3.5 J3.6 J3.7 J3.8 J3.None J3_1.1 J3_1.2 J3_1.3 J3_1.4 J3_1.5 J3_1.6 J3_1.7 J3_1.8 J3_1.None J3_1_1.1 J3_1_1.2 J3_1_1.3 J3_1_1.4 J3_1_1.5 J3_1_1.6 J3_1_1.7 J3_1_1.8 J3_1_1.None J3_2.1 J3_2.2 J3_2.3 J3_2.4 J3_2.5 J3_2.6 J3_2.7 J3_2.8 J3_2.None J4.1 J4.2 J4.3 J4.4 J4.5 J4.6 J4.7 J4.8 J4.None J4_1.1 J4_1.2 J4_1.3 J4_1.4 J4_1.5 J4_1.6 J4_1.7 J4_1.8 J4_1.None J4_1_1.1 J4_1_1.2 J4_1_1.3 J4_1_1.4 J4_1_1.5 J4_1_1.6 J4_1_1.7 J4_1_1.8 J4_1_1.None J4_2.1 J4_2.2 J4_2.3 J4_2.4 J4_2.5 J4_2.6 J4_2.7 J4_2.8 J4_2.None J5.1 J5.2 J5.3 J5.4 J5.5 J5.6 J5.7 J5.8 J5.None J5_1.1 J5_1.2 J5_1.3 J5_1.4 J5_1.5 J5_1.6 J5_1.7 J5_1.8 J5_1.None J5_1_1.1 J5_1_1.2 J5_1_1.3 J5_1_1.4 J5_1_1.5 J5_1_1.6 J5_1_1.7 J5_1_1.8 J5_1_1.None J5_2.1 J5_2.2 J5_2.3 J5_2.4 J5_2.5 J5_2.6 J5_2.7 J5_2.8 J5_2.None J6.1 J6.2 J6.3 J6.4 J6.5 J6.6 J6.7 J6.8 J6.None J6_1.1 J6_1.2 J6_1.3 J6_1.4 J6_1.5 J6_1.6 J6_1.7 J6_1.8 J6_1.None J6_1_1.1 J6_1_1.2 J6_1_1.3 J6_1_1.4 J6_1_1.5 J6_1_1.6 J6_1_1.7 J6_1_1.8 J6_1_1.None J6_2.1 J6_2.2 J6_2.3 J6_2.4 J6_2.5 J6_2.6 J6_2.7 J6_2.8 J6_2.None P1.1 P1.2 P1.3 P1.4 P1.5 P1.6 P1_1.1 P1_1.2 P1_1.3 P1_1.4 P1_1.5 P1_1.6 P1_1_1.1 P1_1_1.2 P1_1_1.3 P1_1_1.4 P1_1_1.5 P1_1_1.6 P1_2.1 P1_2.2 P1_2.3 P1_2.4 P1_2.5 P1_2.6 P2.1 P2.2 P2_1.1 P2_1.2 P2_1_1.1 P2_1_1.2 P2_2.1 P2_2.2 P4.1 P4.2 P4.3 P4.4 P4.5 P4.6 P4.7 P4.8 P4.9 P4.10 P4.11 P4.12 P4.13 P4.14 P4.15 P4.16 P4.17 P4.18 P4.19 P4.20 P4.21 P4.22 P4.23 P4.24 P4.25 P4.26 P4.27 P4.28 P4.29 P4.30 P4.31 P4.32 P4.33 P4.34 P4.35 P4.36 P4.37 P4.38 P4.39 P4.40 P4_1.1 P4_1.2 P4_1.3 P4_1.4 P4_1.5 P4_1.6 P4_1.7 P4_1.8 P4_1.9 P4_1.10 P4_1.11 P4_1.12 P4_1.13 P4_1.14 P4_1.15 P4_1.16 P4_1.17 P4_1.18 P4_1.19 P4_1.20 P4_1.21 P4_1.22 P4_1.23 P4_1.24 P4_1.25 P4_1.26 P4_1.27 P4_1.28 P4_1.29 P4_1.30 P4_1.31 P4_1.32 P4_1.33 P4_1.34 P4_1.35 P4_1.36 P4_1.37 P4_1.38 P4_1.39 P4_1.40 P4_1_1.1 P4_1_1.2 P4_1_1.3 P4_1_1.4 P4_1_1.5 P4_1_1.6 P4_1_1.7 P4_1_1.8 P4_1_1.9 P4_1_1.10 P4_1_1.11 P4_1_1.12 P4_1_1.13 P4_1_1.14 P4_1_1.15 P4_1_1.16 P4_1_1.17 P4_1_1.18 P4_1_1.19 P4_1_1.20 P4_1_1.21 P4_1_1.22 P4_1_1.23 P4_1_1.24 P4_1_1.25 P4_1_1.26 P4_1_1.27 P4_1_1.28 P4_1_1.29 P4_1_1.30 P4_1_1.31 P4_1_1.32 P4_1_1.33 P4_1_1.34 P4_1_1.35 P4_1_1.36 P4_1_1.37 P4_1_1.38 P4_1_1.39 P4_1_1.40 P4_2.1 P4_2.2 P4_2.3 P4_2.4 P4_2.5 P4_2.6 P4_2.7 P4_2.8 P4_2.9 P4_2.10 P4_2.11 P4_2.12 P4_2.13 P4_2.14 P4_2.15 P4_2.16 P4_2.17 P4_2.18 P4_2.19 P4_2.20 P4_2.21 P4_2.22 P4_2.23 P4_2.24 P4_2.25 P4_2.26 P4_2.27 P4_2.28 P4_2.29 P4_2.30 P4_2.31 P4_2.32 P4_2.33 P4_2.34 P4_2.35 P4_2.36 P4_2.37 P4_2.38 P4_2.39 P4_2.40 P5.1 P5.2 P5_1.1 P5_1.2 P5_1_1.1 P5_1_1.2 P5_2.1 P5_2.2 R3.1 R3.2 R3_1.1 R3_1.2 R3_1_1.1 R3_1_1.2 R3_2.1 R3_2.2 R4.1 R4.2 R4_1.1 R4_1.2 R4_1_1.1 R4_1_1.2 R4_2.1 R4_2.2 R13.1 R13.2 R13_1.1 R13_1.2 R13_1_1.1 R13_1_1.2 R13_2.1 R13_2.2 R14.1 R14.2 R14_1.1 R14_1.2 R14_1_1.1 R14_1_1.2 R14_2.1 R14_2.2 R15.1 R15.2 R15_1.1 R15_1.2 R15_1_1.1 R15_1_1.2 R15_2.1 R15_2.2 R16.1 R16.2 R16_1.1 R16_1.2 R16_1_1.1 R16_1_1.2 R16_2.1 R16_2.2 R17.1 R17.2 R17_1.1 R17_1.2 R17_1_1.1 R17_1_1.2 R17_2.1 R17_2.2 R18.1 R18.2 R18_1.1 R18_1.2 R18_1_1.1 R18_1_1.2 R18_2.1 R18_2.2 S1.1 S1.2 S1_1.1 S1_1.2 S1_1_1.1 S1_1_1.2 S1_2.1 S1_2.2 U1.1 U1.2 U1.3 U1.4 U1.5 U1.6 U1.7 U1.8 U1.9 U1.10 U1.11 U1.12 U1.13 U1.14 U1.15 U1.16 U1.17 U1.18 U1.19 U1.20 U1.21 U1.22 U1.23 U1.24 U1.25 U1.26 U1.27 U1.28 U1_1.1 U1_1.2 U1_1.3 U1_1.4 U1_1.5 U1_1.6 U1_1.7 U1_1.8 U1_1.9 U1_1.10 U1_1.11 U1_1.12 U1_1.13 U1_1.14 U1_1.15 U1_1.16 U1_1.17 U1_1.18 U1_1.19 U1_1.20 U1_1.21 U1_1.22 U1_1.23 U1_1.24 U1_1.25 U1_1.26 U1_1.27 U1_1.28 U1_1_1.1 U1_1_1.2 U1_1_1.3 U1_1_1.4 U1_1_1.5 U1_1_1.6 U1_1_1.7 U1_1_1.8 U1_1_1.9 U1_1_1.10 U1_1_1.11 U1_1_1.12 U1_1_1.13 U1_1_1.14 U1_1_1.15 U1_1_1.16 U1_1_1.17 U1_1_1.18 U1_1_1.19 U1_1_1.20 U1_1_1.21 U1_1_1.22 U1_1_1.23 U1_1_1.24 U1_1_1.25 U1_1_1.26 U1_1_1.27 U1_1_1.28 U1_2.1 U1_2.2 U1_2.3 U1_2.4 U1_2.5 U1_2.6 U1_2.7 U1_2.8 U1_2.9 U1_2.10 U1_2.11 U1_2.12 U1_2.13 U1_2.14 U1_2.15 U1_2.16 U1_2.17 U1_2.18 U1_2.19 U1_2.20 U1_2.21 U1_2.22 U1_2.23 U1_2.24 U1_2.25 U1_2.26 U1_2.27 U1_2.28 U3.1 U3.2 U3.3 U3_1.1 U3_1.2 U3_1.3 U5_1.1 U5_1.2 U5_1.3 U5_1.4 U5_1.5 U5_1.6 U5_1.7 U5_1.8 U5_1.9 U5_1.10 U5_1.11 U5_1.12 U5_1.13 U5_1.14 U5_1.15 U5_1.16 U5_1.17 U5_1.18 U5_1.19 U5_1.20 U5_1_1.1 U5_1_1.2 U5_1_1.3 U5_1_1.4 U5_1_1.5 U5_1_1.6 U5_1_1.7 U5_1_1.8 U5_1_1.9 U5_1_1.10 U5_1_1.11 U5_1_1.12 U5_1_1.13 U5_1_1.14 U5_1_1.15 U5_1_1.16 U5_1_1.17 U5_1_1.18 U5_1_1.19 U5_1_1.20 U9.1 U9.2 U9.3 U9.4 U9.5 U9.6 U9.7 U9.8 U9_1.1 U9_1.2 U9_1.3 U9_1.4 U9_1.5 U9_1.6 U9_1.7 U9_1.8 U9_1_1.1 U9_1_1.2 U9_1_1.3 U9_1_1.4 U9_1_1.5 U9_1_1.6 U9_1_1.7 U9_1_1.8 U9_2.1 U9_2.2 U9_2.3 U9_2.4 U9_2.5 U9_2.6 U9_2.7 U9_2.8 U?.1 U?.2 U?.3 U?.4 U?_1.1 U?_1.2 U?_1.3 U?_1.4 U?_1_1.1 U?_1_1.2 U?_1_1.3 U?_1_1.4 U?_2.1 U?_2.2 U?_2.3 U?_2.4 W1.1 W1.2 W1_1.1 W1_1.2 W1_1_1.1 W1_1_1.2 W1_2.1 W1_2.2 W2.1 W2.2 W2_1.1 W2_1.2 W2_1_1.1 W2_1_1.2 W2_2.1 W2_2.2 W3.1 W3.2 W3_1.1 W3_1.2 W3_1_1.1 W3_1_1.2 W3_2.1 W3_2.2
copper on no net: | length 10132.3
  Top Layer w0.015: 101.067,106.121 105.613,106.121 ; 101.448,218.77 105.994,218.77